# Altium PCB 0.PCB1.PcbDoc (part 4 of 10)
Units mil, origin at the board's own origin, x right, y up, seen from the top; angles counter-clockwise.
Board outline 3897.64 x 3897.64 mil, 6 copper layers (Top Layer, Layer 1, Layer 3, Layer 4, Layer 2, Bottom Layer), stack 60.567 mil thick; 715 components, 563 nets, 2530 pads, 1442 vias.
Unrouted connection lines stored in the file: 6.
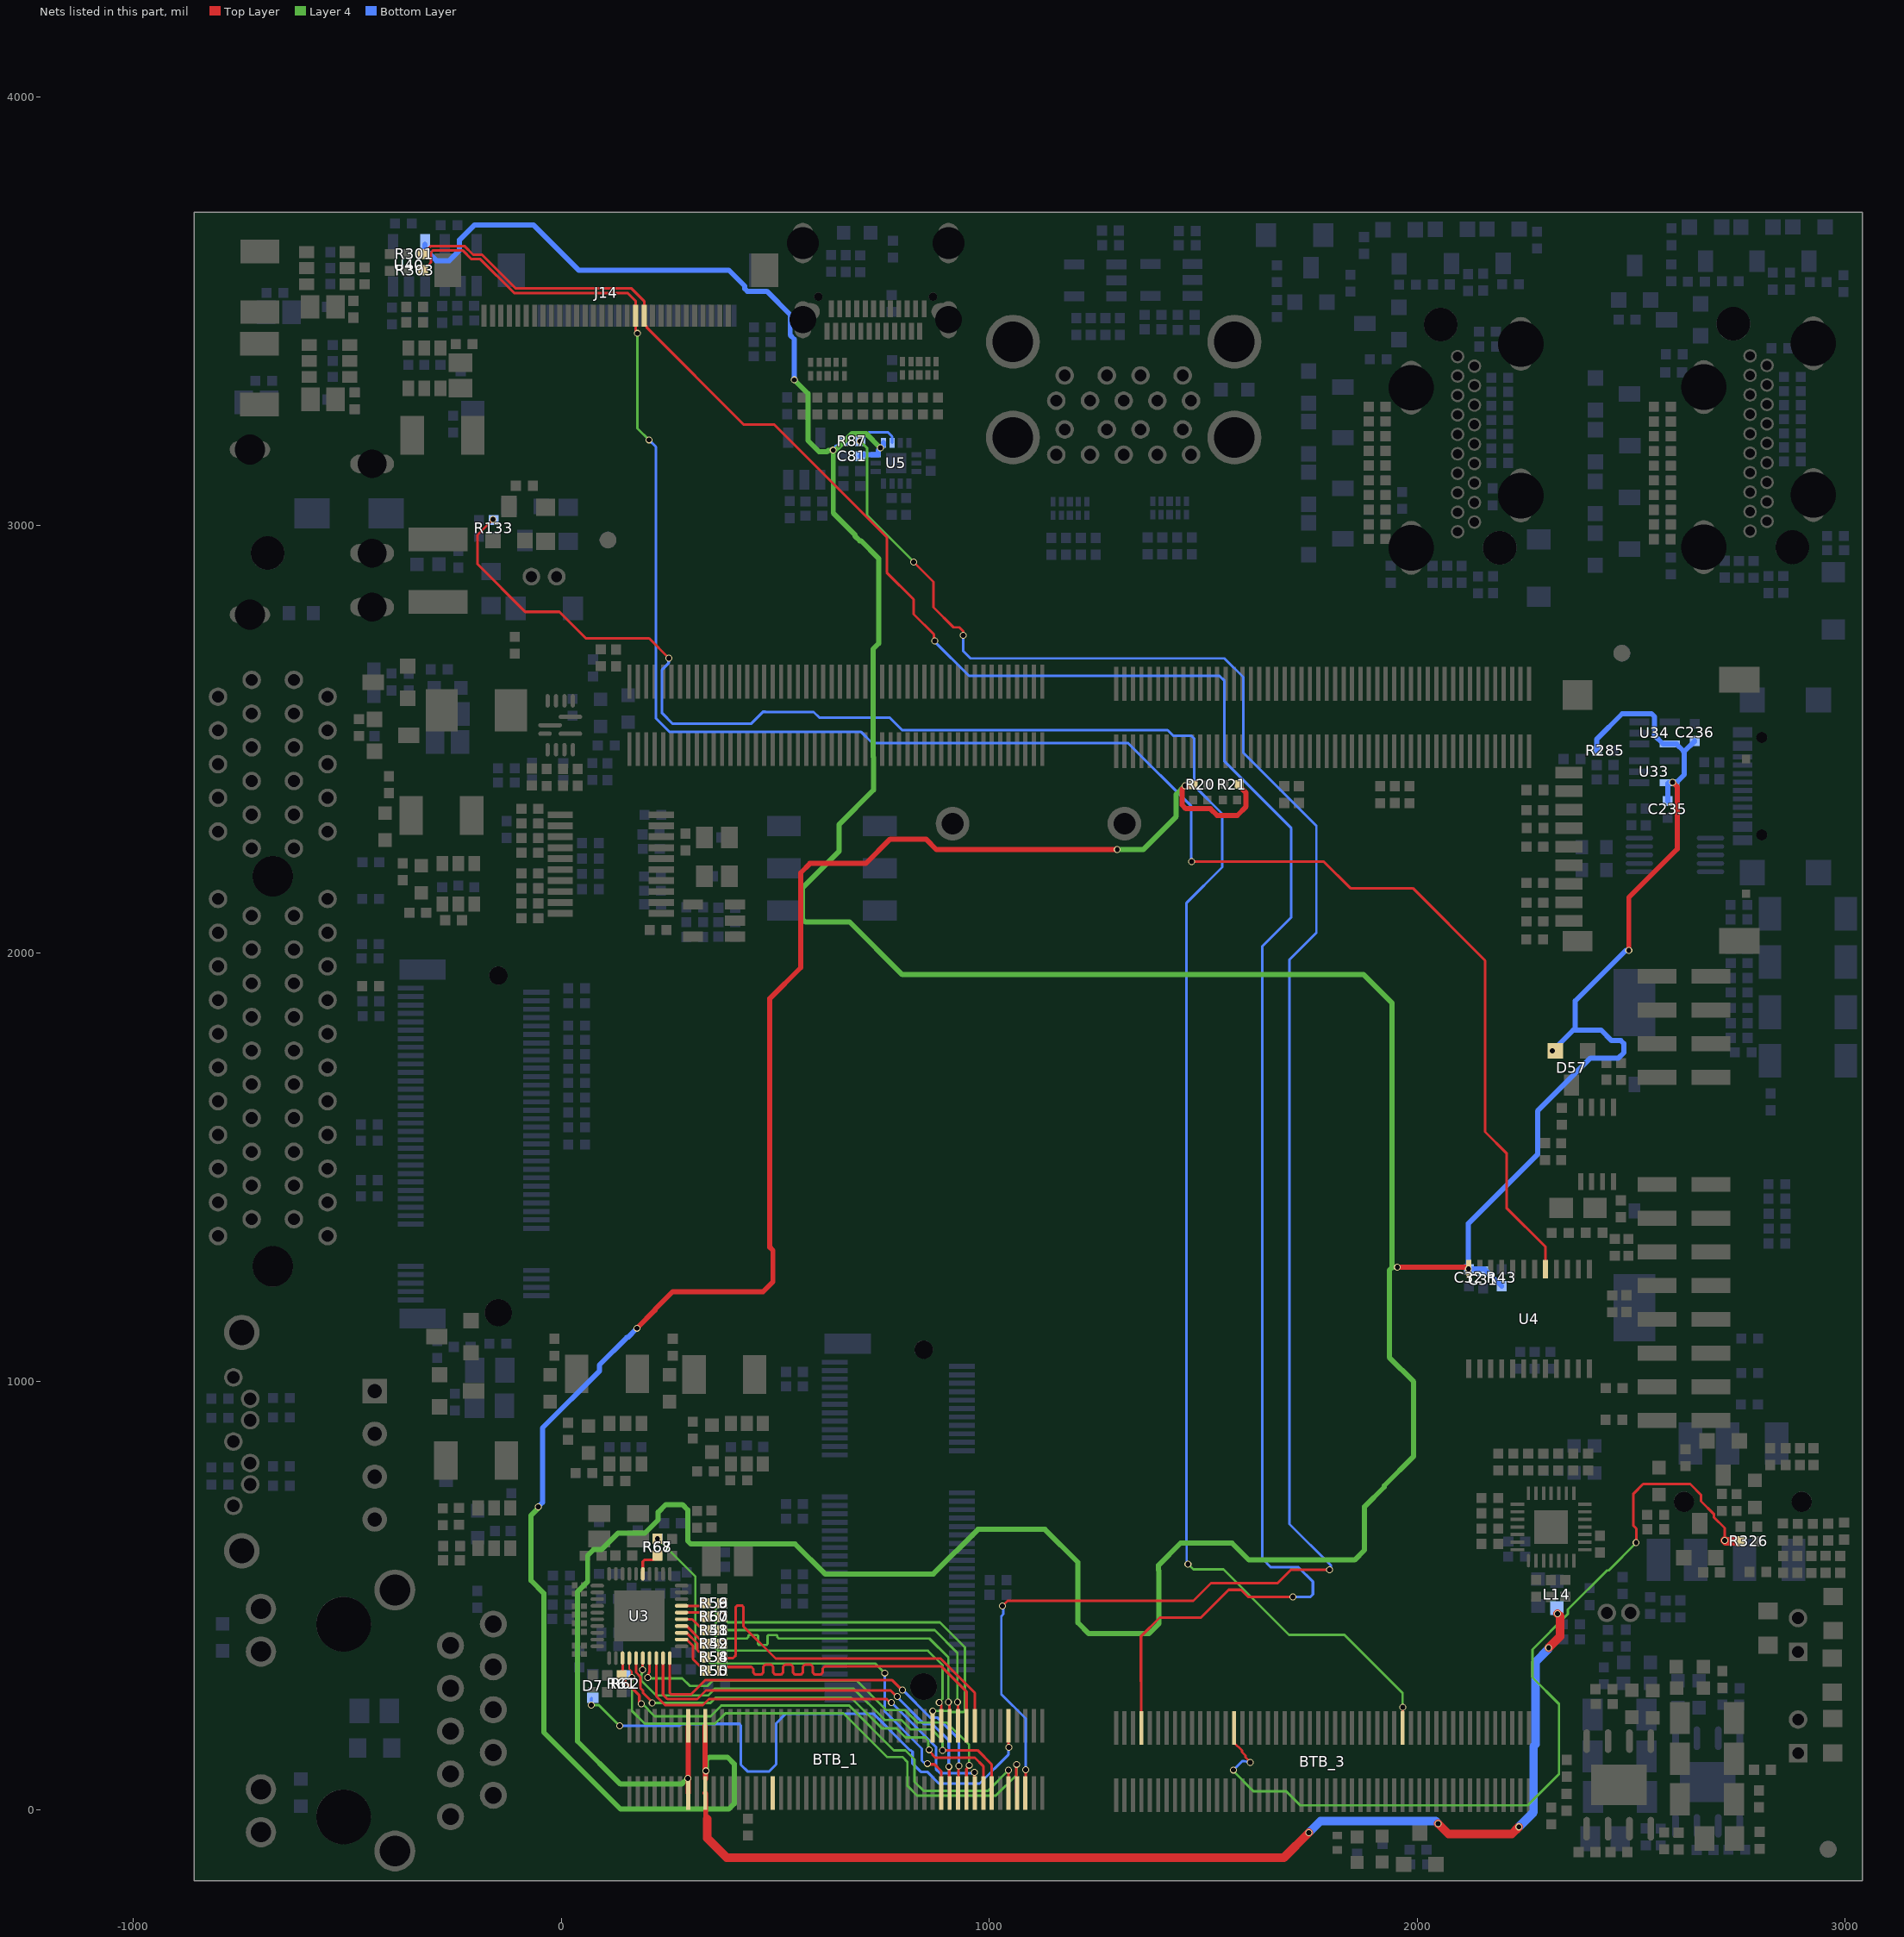
[diagram p7: the nets of this part, all layers, seen from the top]

## Via types
v1: diameter 16.14, hole 11.81, Top Layer to Bottom Layer, tented both sides, 1434 vias
v2: diameter 16.14, hole 11.81, Top Layer to Bottom Layer, 8 vias

## Nets (pads, with @x,y where several pads share a name; then routed paths per layer and width w, separated by ;. In a path a pad name is that pad's centre, name@x,y a point inside that pad or via, vN(x,y) a via of type N, cw(c..) or ccw(c..) an arc to the next point about the centre after c; other vN are vias at no path point) (continued)
CORE_VCC_3V3_S3: BTB_1.8 BTB_1.93 C31.1 C32.1 C81.1 C235.1 C236.1 D57.2 R43.1 R87.1 R285.1 U4.24 U5.3 U5.4 U33.5 U34.5 U40.5 | length 11335.2
  Top Layer w12: v1(296.1,72.8) 297.28,71.62 BTB_1.93@297.28,38.17 ; BTB_1.93@297.29,72.8 296.69,73.4 296.69,195.06 BTB_1.8@297.28,195.65 ; v1(1953.65,1266.5) U4.24@2120.56,1266.5 ; v1(2494.4,2007) 2494.4,2130.6 2607.6,2243.8 2607.6,2389.2 v1(2596.9,2399.9)
  Layer 4 w12: 38.3,508.8 38.3,159.34 138.44,59.2 281.38,59.2 294.98,72.8 v1(296.1,72.8) ; 38.6,508.8 61.8,532 61.8,593.2 75.5,606.9 94.1,606.9 132.4,645.2 195.1,645.2 226.8,676.9 226.8,694.5 244.7,712.4 283.1,712.4 295.87,699.63 295.87,627.23 302.9,620.2 546.7,620.2 616.7,550.2 869.5,550.2 973.7,654.4 1130.2,654.4 1207,577.6 1207,436.5 1232.7,410.8 1373.4,410.8 1396.3,433.7 1396.3,557.9 1395.6,558.6 1395.6,570.6 1447.3,622.3 1567.4,622.3 1606.8,582.9 1853.8,582.9 1877.1,606.2 1877.1,707.5 1922.9,753.3 1922.9,756.4 1991.7,825.2 1991.7,999.3 1934.9,1056.1 1934.9,1259.9 1941.5,1266.5 ; v1(544.7,3339.5) 576.43,3307.77 576.43,3198.01 602.51,3171.93 621.39,3171.93 624.03,3174.57 635.47,3174.57 635.72,3174.82 635.72,3028.45 687.03,2977.14 687.03,2974.21 697.61,2963.63 700.54,2963.63 741.7,2922.47 741.7,2723.7 728.9,2710.9 728.9,2458.7 730,2457.6 730,2381.7 648.9,2300.6 648.9,2238 563.47,2152.57 563.47,2080.43 570.5,2073.4 673.7,2073.4 797,1950.1 1875,1950.1 1941.5,1883.6 1941.5,1266.5 ; v1(635.72,3175.36) 636.51,3176.16 641.55,3176.16 679.87,3214.47 712.33,3214.47 v1(746.1,3180.7) ; v1(1953.65,1266.5) 1941.5,1266.5
  Bottom Layer w12: U40.5@-318,3656.41 -318,3644.61 -291.69,3618.3 -261.39,3618.3 -237.33,3642.36 -237.33,3666.64 -202.87,3701.1 -64.2,3701.1 41,3595.9 391.51,3595.9 429.01,3558.4 429.01,3552.53 434.87,3546.67 480.43,3546.67 535.04,3492.06 535.04,3444.27 544.7,3434.6 v1(544.7,3339.5) ; 643.46,3183.23 646.23,3183.23 R87.1@659.4,3196.4 ; C81.1@698.76,3161.43 701.92,3164.59 734.93,3164.59 U5.3@735.02,3164.69 740.74,3164.69 740.83,3164.78 v1@740.83,3174.62 ; v1(746.1,3180.7) 746.49,3181.09 747.31,3181.09 753.13,3186.92 U5.4@753.13,3192.64 ; R43.1@2197.42,1222.58 2157.31,1262.7 v1(2119.8,1262.7) 2119.8,1369 2281.2,1530.4 2281.2,1631.5 2405,1755.3 2470.2,1755.3 2482.9,1768 2482.9,1789.23 2475.87,1796.26 2454.15,1796.26 2429.81,1820.6 2369,1820.6 ; v1(2315.8,1772) 2364.4,1820.6 2369,1820.6 ; R285.1@2419.63,2473.22 2419.63,2500.54 2478.81,2559.73 2547.5,2559.73 2554.53,2552.7 2554.53,2509.07 2574.46,2489.14 U34.5@2589.96,2489.14 2605.46,2489.14 2622.7,2471.9 ; v1(2494.4,2007) 2487.41,2007 2369,1888.59 2369,1820.6 ; C235.1@2585.16,2355.8 2585.16,2396.64 U33.5@2587.16,2398.64 ; U33.5@2589.46,2398.64 2604.96,2398.64 2624.03,2417.71 2624.03,2470.57 2622.7,2471.9 ; 2621.9,2471.9 2622.7,2471.9 ; C236.1@2648.36,2496.04 2624.22,2471.9 2622.7,2471.9
CORE_VCCA_1V8_S0: BTB_1.10 BTB_1.91 L14.1 R20.2 R21.2 | length 7197.5
  Top Layer w12: v1(176.98,1124.22) 219.09,1166.33 219.09,1168.09 260.4,1209.4 471.6,1209.4 494.8,1232.6 494.8,1306 487.5,1313.3 487.5,1894.6 559.6,1966.7 559.6,2188.2 581.2,2209.8 711.9,2209.8 769,2266.9 852.2,2266.9 876.8,2242.3 1276.1,2242.3 ; BTB_1.91@336.65,38.17 337.73,37.09 337.73,-19.06 340.97,-22.3 ; BTB_1.10@336.65,195.65 336.65,92.97 338.2,91.42 v1(338.2,90.3) 337.43,89.53 BTB_1.91@337.43,71.54 ; 1277.7,2242.7 1278.1,2242.3 v1(1299.2,2242.3) ; v1(1457.5,2391.8) 1457.83,2391.47 v1@1457.83,2390.9 ; R20.2@1474.4,2394.7 1474.4,2392.14 1473.16,2390.9 v1@1457.83,2390.9 ; R21.2@1580.8,2394.4 1600.22,2374.98 1600.22,2342.72 1579.6,2322.1 1532.73,2322.1 1516.97,2337.86 1496.06,2337.86 1495.96,2337.96 1490.67,2337.96 1490.57,2337.86 1459.64,2337.86 1450.8,2346.7 1450.8,2383.87 v1@1457.83,2390.9
  Top Layer w20: 340.97,-22.3 340.97,-66.87 386.3,-112.2 1688.9,-112.2 v1(1746.9,-54.2) ; v1(2049.1,-33.1) 2073.3,-57.3 2220.9,-57.3 v1(2237.6,-40.6) ; v1(2307.1,377.9) 2333.4,404.2 2333.4,451.7 v1(2327.8,457.3)
  Layer 4 w12: v1@-51.9,705.6 -70.4,687.1 -70.4,534.9 -40.6,505.1 -40.6,180.27 138.77,0.9 391.6,0.9 404.4,13.7 404.4,106.4 388.7,122.1 346,122.1 338.97,115.07 338.97,91.07 v1(338.2,90.3) ; v1(1299.2,2242.3) 1359.7,2242.3 1437,2319.6 1437,2371.3 v1(1457.5,2391.8)
  Bottom Layer w12: v1(-53.3,707) -53.3,707.3 -43.3,717.3 -43.3,891.4 89.2,1023.9 89.2,1038.39 153.33,1102.52 155.27,1102.52 v1(176.98,1124.22)
  Bottom Layer w20: v1(1746.9,-54.2) 1773.8,-27.3 2043.3,-27.3 v1(2049.1,-33.1) ; v1(2237.6,-40.6) 2271.87,-6.33 2271.87,147.47 2276.39,151.98 2276.39,344.79 2307.1,375.5 v1(2307.1,377.9)
CTP0_INT: BTB_3.4 J14.11 R301.2 | length 5395.6
  Top Layer w6.16: R301.2@-323.22,3633.2 -303.99,3652.43 -226.15,3652.43 -205.47,3631.75 -184.58,3631.75 -106.63,3553.8 163.6,3553.8 193.87,3523.53 193.87,3469.84 200.57,3463.14 200.57,3461 426.67,3234.9 498.2,3234.9 760.8,2972.3 760.8,2889.5 823.6,2826.7 823.6,2792.4 870.9,2745.1 870.9,2732.2 v1(873.2,2729.9) ; 1354.6,299 1354.6,404.5 1398.34,448.24 1494.66,448.24 1559.62,513.2 1588.7,513.2 1605.3,496.6 v1(1709.4,496.6) ; BTB_3.4@1355.54,190.65 1355.54,299
  Bottom Layer w6.16: v1(873.2,2729.9) 873.2,2727.56 952.66,2648.1 1538.14,2648.1 1549.8,2636.44 1549.8,2448.2 1705.9,2292.1 1705.9,2084.5 1637.9,2016.5 1637.9,586 1658.1,565.8 1722.6,565.8 1756.4,532 1756.4,502.7 1750.3,496.6 v1(1709.4,496.6)
CTP0_RST: J14.12 R303.2 U4.17 | length 4599.8
  Top Layer w6.16: R303.2@-322.72,3595.6 -304.34,3613.98 -304.34,3637.14 -299.21,3642.27 -230.36,3642.27 -209.68,3621.59 -188.79,3621.59 -109.53,3542.33 155.57,3542.33 174.18,3523.72 J14.12@174.18,3489.52 174.18,3452.32 v1(178.2,3448.3) ; v1(1473.05,2214) 1782.25,2214 1844.12,2152.12 1989.72,2152.12 2158.81,1983.04 2158.81,1583.1 2208.71,1533.2 2208.71,1405.26 2299.79,1314.18 U4.17@2299.79,1261.94
  Layer 4 w5.61: v1(178.2,3448.3) 178.2,3226.3 v1(205.1,3199.4)
  Bottom Layer w6.16: v1(205.1,3199.4) 221.4,3183.1 221.4,2548.95 252.65,2517.7 700.1,2517.7 726.75,2491.05 1324.55,2491.05 1472.2,2343.4 1472.2,2214.85 v1(1473.05,2214)
EARPHONE_CTL: BTB_3.15 R326.2 | length 2090.5
  Top Layer w5.61: BTB_3.15@1572.7,177.5 1572.7,155.58 1590.53,137.76 1590.53,134.17 1596.66,128.04 1598.84,125.86 1598.84,121.9 1609.96,110.77 v1(1609.96,109.71)
  Top Layer w6.16: v1(2511.5,623.4) 2512.2,624.1 2512.2,655.9 2505.3,662.8 2505.3,737.8 2527.89,760.39 2637.74,760.39 2663.25,734.87 2663.25,720.15 2692.93,690.47 2692.93,682.91 2718.31,657.53 v1(2718.31,628.42)
  Top Layer w20: v1(2718.31,628.42) 2720.21,626.52 R326.2@2755.03,626.52
  Layer 4 w5.61: v1(1570.4,92.2) 1569.25,91.05 1569.25,90.75 1617.5,42.5 1693.9,42.5 1726.6,9.8 2258.1,9.8 2331.3,83 2331.3,246.3 2269.11,308.49 2269.11,373.8 2352.2,456.89 2352.2,467.6 2443.2,558.6 2447.4,558.6 v1@2511.85,623.05
  Bottom Layer w5.61: v1(1570.4,92.2) 1590.67,112.47 1591.01,112.81 1595.66,112.81 v1(1609.96,109.71)
EXT_PWR_EN: BTB_1.83
FAN_CTRL: BTB_3.35 R133.1 | length 4783.4
  Top Layer w6.16: v1(-159.3,3013.8) -195.5,2977.6 -195.5,2909.3 -84,2797.8 -4.3,2797.8 57.7,2735.8 205.6,2735.8 v1(251.8,2689.6) ; BTB_3.35@1965.78,190.65 1966.07,190.95 1966.07,238.64 v1(1966.36,238.94)
  Layer 4 w5.61: v1(1464.4,573.3) 1464.9,573.3 1477.25,560.95 1547.55,560.95 1700.6,407.9 1829.89,407.9 1965.7,272.09 1965.7,239.6 v1(1966.36,238.94)
  Bottom Layer w5.61: 1461.3,619.11 1461.3,579.25 1464.4,576.15 v1(1464.4,573.3)
  Bottom Layer w6.16: v1(251.8,2689.6) 251.17,2688.97 251.17,2678.07 235.79,2662.69 235.79,2561.05 260.74,2536.1 443.6,2536.1 471.65,2564.15 476.75,2564.15 477.2,2563.7 590,2563.7 603.3,2550.4 767.9,2550.4 796.75,2521.55 1416.95,2521.55 1430.2,2508.3 1472.6,2508.3 1478.7,2502.2 1478.7,2392 1544.5,2326.2 1544.5,2201.1 1461.3,2117.9 1461.3,619.11
FUSB302_INT: BTB_1.53 R87.2 U5.5 | length 4867.3
  Top Layer w5.61: v1(823.5,2914.1) 869.8,2867.8 869.8,2808.5 916.7,2761.6 930.3,2761.6 939.5,2752.4 v1(939.5,2742.9) ; v1(1030.86,475.37) 1043.01,487.52 1477.22,487.52 1518.6,528.9 1673.9,528.9 1705.1,560.1 v1(1795.1,560.1) ; BTB_1.53@1084.68,38.17 1085.04,38.53 1085.04,92.64 v1(1085.4,93)
  Layer 4 w5.61: v1(698.76,3196.4) 714.9,3180.26 714.9,3023.91 823.5,2915.31 v1(823.5,2914.1)
  Bottom Layer w5.61: v1(939.5,2742.9) 939.5,2706.1 956.6,2689 1549.64,2689 1593.8,2644.84 1593.8,2468.39 1764.4,2297.8 1764.4,2048.2 1701.4,1985.2 1701.4,667.05 1798,570.46 v1@1798,557.2 ; v1(1030.86,475.37) 1032.87,473.35 1032.87,460.89 1033.04,460.72 1033.04,456.08 1028.52,451.56 1028.52,269.38 1085.4,212.5 v1(1085.4,93)
  Bottom Layer w6.16: v1(698.76,3196.4) 719.36,3217 763.76,3217 773.36,3207.4 773.36,3193.18 U5.5@772.82,3192.64
GMAC0_MCLKINOUT: BTB_1.63 R67.1 R68.1 | length 1106.6
  Top Layer w6.16: v1(855.42,107.35) 857.33,105.44 872.18,105.44 887.83,89.78 BTB_1.63@887.83,38.17
  Layer 4 w5.61: v1(225.06,632.56) 313.67,543.95 313.67,376.53 347.6,342.6 364.25,342.6 365.95,340.9 734.3,340.9 v1(756.4,318.8)
  Bottom Layer w6.16: v1(756.4,318.8) 756.4,228.6 842.8,142.2 842.8,114.08 847.67,109.21 853.56,109.21 v1(855.42,107.35)
GMAC0_MCLKINOUT_R: R67.2 U3.35 | length 68.8
  Top Layer w6.16: U3.35@190.76,550.54 190.76,579.27 194.37,582.88 214.74,582.88 R67.2@225.06,593.2
GMAC0_MDC: BTB_1.55 R61.2 U3.13 | length 1195.8
  Top Layer w6.16: U3.13@143.52,353.68 143.52,315.24 R61.2@141.56,313.28 149.9,304.94 149.9,296.41 153.51,292.8 156.29,292.8 182.7,266.39 182.7,250.26 186.31,246.65 v1(187.34,246.65) ; v1(1045.1,91.5) 1045.21,91.39 1045.21,38.28 BTB_1.55@1045.31,38.17
  Layer 4 w5.61: v1@187.7,248.5 188,248.5 218.7,217.8 349.3,217.8 374.1,242.6 673,242.6 777.2,138.4 804.6,138.4 825.8,117.2 825.8,64.9 847.2,43.5 997.1,43.5 v1(1045.1,91.5)
GMAC0_MDIO: BTB_1.54 R62.2 U3.14 | length 1273.3
  Top Layer w4: U3.14@159.27,353.68 159.27,328.14 165.43,321.99 v1(165.43,308.34)
  Top Layer w6.16: v1(1063.9,105.3) 1063.2,104.6 1063.2,39.97 BTB_1.54@1065,38.17
  Layer 4 w5.61: v1@165.2,309.3 165.43,309.07 v1(165.43,308.34) 165.43,230.27 195.3,200.4 359.6,200.4 384,224.8 659.3,224.8 761.8,122.3 798,122.3 809,111.3 809,55.2 831.9,32.3 1015.4,32.3 1063.9,80.8 v1(1063.9,105.3)
GMAC0_RSTn: BTB_1.46 D7.1 | length 1404.6
  Top Layer w6.16: BTB_1.46@1045.32,195.65 1045.32,145.68 v1(1045.9,145.1)
  Layer 4 w5.61: v1(70.68,243.82) 70.9,243.6 88.1,243.6 136.4,195.3 v1(136.5,195.3)
  Bottom Layer w6.16: v1(70.68,243.82) 70.68,259.58 D7.1@71.1,260 ; v1(136.5,195.3) 275.85,195.3 280.65,200.1 416.32,200.1 419.93,196.49 419.93,104.66 436.09,88.5 485.2,88.5 502.2,105.5 502.2,119 502.7,119.5 502.7,201.5 525.12,223.92 729.58,223.92 815.2,138.3 817.39,138.3 821,134.69 821,107.2 840.2,88 855.2,88 882.5,60.7 977.6,60.7 1044.69,127.79 1044.69,143.89 v1(1045.9,145.1)
GMAC0_RXCLK: BTB_1.38 R56.1 R59.1 | length 810.2
  Top Layer w6.16: v1(883.3,250.1) 883.3,248.3 887.83,243.77 BTB_1.38@887.83,195.65
  Layer 4 w5.61: v1(376.5,481.78) 374.48,479.76 364.96,479.76 361.4,476.2 361.4,375.1 365.45,371.05 390.31,371.05 857.05,371.05 890.8,337.3 890.8,258.65 883.3,251.15 v1(883.3,250.1)
GMAC0_RXCLK_R: R56.2 U3.27 | length 58.3
  Top Layer w6.16: U3.27@281.32,475.73 331.09,475.73 R56.2@337.14,481.78
GMAC0_RXD0: BTB_1.40 R48.2 R51.1 | length 741.9
  Top Layer w6.16: v1(925.8,251.1) 927.2,249.7 BTB_1.40@927.2,195.65
  Layer 4 w5.61: v1@376.61,418.78 872.82,418.78 925.8,365.8 v1(925.8,251.1)
  other v1: 376.44,418.78
GMAC0_RXD0_R: R51.2 U3.25 | length 66.3
  Top Layer w6.16: U3.25@281.32,444.24 306.31,444.24 323.05,427.5 328.36,427.5 R51.2@337.08,418.78
GMAC0_RXD1: BTB_1.39 R49.2 R52.1 | length 763.2
  Top Layer w6.16: v1(904.7,250.6) 907.52,247.78 BTB_1.39@907.52,195.65
  Layer 4 w5.61: v1(376.44,387.28) 388.66,399.5 431.1,399.5 433.91,399.5 437.19,402.79 437.19,405.4 439.45,407.66 457.54,407.66 459.8,405.4 459.8,386.75 462.06,384.49 480.15,384.49 482.41,386.75 482.41,405.4 484.67,407.66 502.76,407.66 505.02,405.4 505.02,402.79 508.31,399.5 518.4,399.5 860.3,399.5 904.7,355.1 v1(904.7,250.6)
GMAC0_RXD1_R: R52.2 U3.24 | length 72.8
  Top Layer w6.16: U3.24@281.32,428.49 293.12,428.49 325.62,396 328.36,396 R52.2@337.08,387.28
GMAC0_RXD2: BTB_1.42 R54.1 R58.1 | length 889.5
  Top Layer w6.16: v1(376.44,355.78) R54.1@379.78,352.44 ; R54.1@386.7,353.7 401.6,353.7 408.1,360.2 408.1,473.09 411.71,476.7 422.39,476.7 426,473.09 426,427.84 501.4,352.44 886.44,352.44 966.57,272.31 BTB_1.42@966.57,195.65
GMAC0_RXD2_R: R54.2 U3.23 | length 88.2
  Top Layer w6.16: U3.23@281.32,412.74 293.13,412.74 318.2,387.67 318.2,372.55 322.35,368.4 324.46,368.4 R54.2@337.08,355.78
GMAC0_RXD3: BTB_1.41 R50.2 R55.1 | length 811.6
  Top Layer w6.16: v1(376.44,324.28) 385.16,333 418.1,333 444.34,333 448.97,328.37 448.97,319.71 453.6,315.07 467.5,315.07 472.13,319.71 472.13,333.76 476.76,338.4 490.66,338.4 495.29,333.76 495.29,319.71 499.92,315.07 513.82,315.07 518.45,319.71 518.45,333.76 523.08,338.4 536.98,338.4 541.61,333.76 541.61,319.71 546.24,315.07 560.14,315.07 564.77,319.71 564.77,333.76 569.4,338.4 583.3,338.4 587.93,333.76 587.93,319.71 592.56,315.07 606.46,315.07 611.09,319.71 611.09,329.48 615.72,334.11 675.31,334.11 888.19,334.11 946.89,275.41 BTB_1.41@946.89,195.65
GMAC0_RXD3_R: R55.2 U3.22 | length 104
  Top Layer w6.16: U3.22@281.32,396.99 293.12,396.99 308.04,382.07 308.04,351.21 326.25,333 328.36,333 R55.2@337.08,324.28
GMAC0_RXDV_CRS: BTB_1.37 R57.1 R60.1 | length 856
  Top Layer w6.16: BTB_1.37@868.15,195.65 868.15,230.05 v1(868.3,230.2)
  Layer 4 w5.61: v1(376.44,450.28) 389.62,437.1 884.79,437.1 943.1,378.8 943.1,230.89 939.81,227.6 906.78,227.6 904.18,230.2 v1(868.3,230.2)
GMAC0_RXDV_CRS_R: R57.2 U3.26 | length 59.8
  Top Layer w6.16: U3.26@281.32,459.98 327.38,459.98 R57.2@337.08,450.28
GMAC0_TXCLK: BTB_1.61 U3.20 | length 955.8
  Top Layer w6.16: U3.20@253.76,353.68 253.76,272.39 257.37,268.78 303.09,268.78 336.31,302 773.4,302 796,279.4 v1(797.61,279.4) ; BTB_1.61@927.2,38.17 928.05,39.02 928.05,100.75 v1(928.9,101.6)
  Bottom Layer w6.16: v1(797.61,279.4) 861.96,215.05 878.55,215.05 928.9,164.7 v1(928.9,101.6)
GMAC0_TXD0: BTB_1.59 U3.18 | length 998.5
  Top Layer w6.16: U3.18@222.26,353.68 222.26,264.64 243.1,243.8 331.1,243.8 345.3,258 760.84,258 768.85,249.99 v1(771.55,249.99) ; v1(965.25,87) 965.91,86.34 965.91,38.84 BTB_1.59@966.57,38.17
  Bottom Layer w6.16: v1(771.55,249.99) 875.55,145.99 875.55,94.45 884.9,85.1 963.35,85.1 v1(965.25,87)
GMAC0_TXD1: BTB_1.60 U3.17 | length 991.1
  Top Layer w6.16: v1(202.33,307.99) 204.24,309.9 204.24,318.71 206.51,320.98 U3.17@206.51,353.68 ; BTB_1.60@946.89,38.17 946.89,94.39 953.1,100.6 v1(953.1,103.3)
  Layer 4 w5.61: v1@201.7,310.6 206.1,306.2 283.1,306.2 300.67,288.63 341.75,288.63 354.62,301.5 690.6,301.5 760,232.1 803.9,232.1 833.1,202.9 901.3,202.9 953.1,151.1 v1(953.1,103.3)
GMAC0_TXD2: BTB_1.57 U3.16 | length 1047.6
  Top Layer w6.16: v1(190.36,326.26) 190.56,326.46 190.56,353.48 U3.16@190.76,353.68 ; v1(891,138.4) 972.8,138.4 1005.94,105.26 BTB_1.57@1005.94,38.17
  Layer 4 w5.61: v1(190.36,326.26) 188.35,324.25 188.35,315.05 187.45,314.15 187.45,301.28 222.44,266.3 342.9,266.3 359.3,282.7 682.7,282.7 756.1,209.3 794.6,209.3 816.8,187.1 865.3,187.1 891,161.4 v1(891,138.4)
GMAC0_TXD3: BTB_1.58 U3.15 | length 1042
  Top Layer w6.16: U3.15@175.02,353.68 175.02,320.18 185.15,310.05 185.15,283.55 191.6,277.1 191.6,272 212.74,250.86 v1(212.74,248.92) ; v1(859.87,139.6) 859.87,136.9 867.65,129.12 867.65,127.25 874,120.9 966.5,120.9 986.26,101.14 BTB_1.58@986.26,38.17
  Layer 4 w5.61: v1(212.74,248.92) 212.94,249.12 348.72,249.12 360.8,261.2 677.6,261.2 749.4,189.4 783.3,189.4 804.6,168.1 850.31,168.1 858,160.41 858,141.47 v1(859.87,139.6)
GMAC0_TXEN: BTB_1.62 U3.19 | length 939.7
  Top Layer w6.16: U3.19@238.01,353.68 238.01,267.99 248.2,257.8 318,257.8 338.1,277.9 769.9,277.9 783.92,263.88 v1(785.5,263.88) ; v1(905.6,100.25) 906.56,99.29 906.56,39.13 BTB_1.62@907.52,38.17
  Bottom Layer w6.16: v1(785.5,263.88) 785.5,262.14 848.44,199.2 868,199.2 905.6,161.6 905.6,145.23 906.15,144.68 906.15,132.12 905.6,131.57 v1(905.6,100.25)